# Altium PCB a4403-ELE_PCB.PcbDoc (part 4 of 5)
Units mm, origin at the board's own origin, x right, y up, seen from the top; angles counter-clockwise.
Board outline 160 x 110 mm, 4 copper layers (Top Layer, Int1 (GND), Int2 (PWR), Bottom Layer), stack 1.369 mm thick; 389 components, 298 nets, 1653 pads, 661 vias.
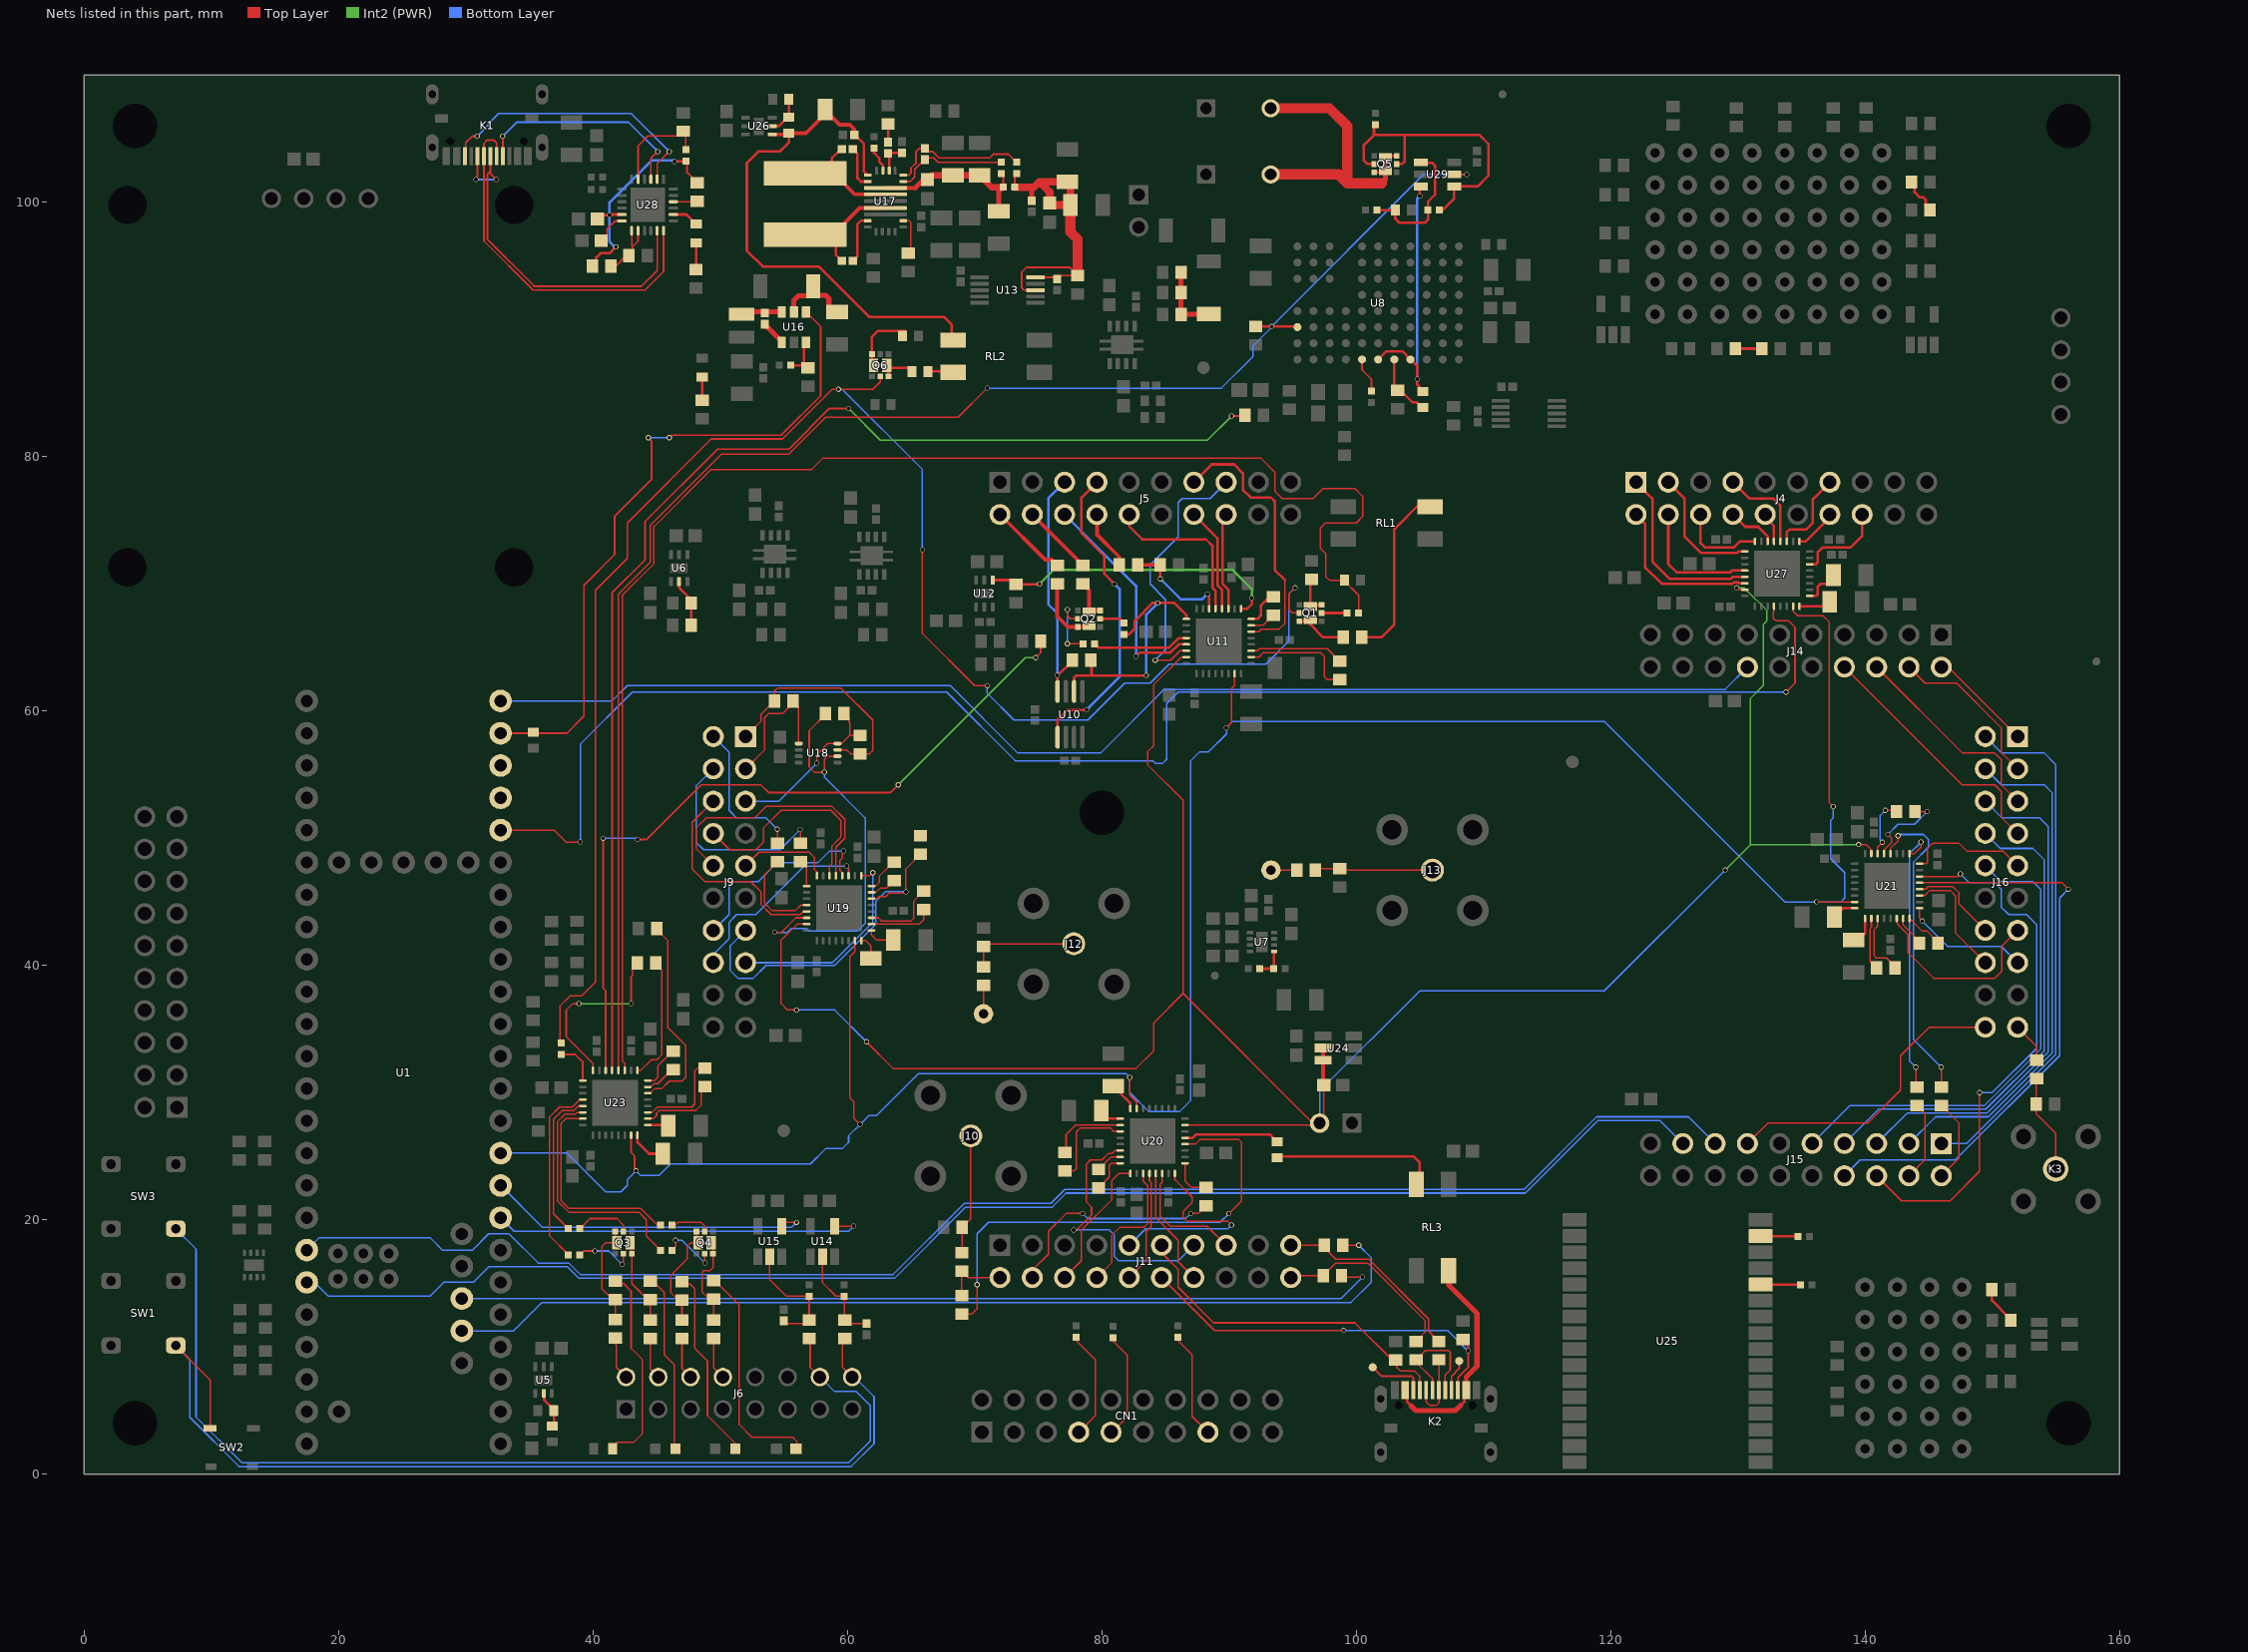
[diagram p5: the nets of this part, all layers, seen from the top]

## Via types
v1: diameter 0.4, hole 0.3, Top Layer to Bottom Layer, tented both sides, 576 vias
v2: diameter 0.5, hole 0.2, Top Layer to Bottom Layer, tented both sides, 59 vias
v3: diameter 0.4, hole 0.2, Top Layer to Bottom Layer, tented both sides, 24 vias
v4: diameter 0.5, hole 0.2, Top Layer to Bottom Layer, 2 vias

## Nets (pads, with @x,y where several pads share a name; then routed paths per layer and width w, separated by ;. In a path a pad name is that pad's centre, name@x,y a point inside that pad or via, vN(x,y) a via of type N, cw(c..) or ccw(c..) an arc to the next point about the centre after c; other vN are vias at no path point) (continued)
NetC48_2: C48.2 C59.1 C60.1 C102.1 C103.1 R50.1 R69.1 R71.1 U13.8 U13.10 | length 28.6
  Top Layer w0.14: R69.1@73.15,101.2 73.15,102.1 R71.1@73.3,102.25 ; U13.8@74.8,93.1 73.9,93.1 73.7,93.3 73.7,94.5 74.1,94.9 77.45,94.9 R50.1@78.1,94.25 76.77,94.25 C48.2@76.5,93.98 76.38,94.1 U13.10@74.8,94.1
  Top Layer w0.4: C102.1@74.5,100.14 74.5,101.025 74.675,101.2 ; C103.1@75.9,99.95 C103.1@76.05,99.8 ; C60.1@77.3,101.625 C60.1@77.525,101.4
  Top Layer w0.6: R69.1@73.15,101.2 74.675,101.2 75.1,101.625 ; C103.1@75.9,99.95 75.9,100.825 75.1,101.625 ; C103.1@76.05,99.8 C59.1@77.525,99.8 C60.1@77.525,101.4 ; C60.1@77.3,101.625 75.1,101.625
  Top Layer w0.8: C59.1@77.525,99.8 77.525,97.675 78.1,97.1 R50.1@78.1,94.25
NetC50_2: C50.2 D1.1 U16.5 | length 6.1
  Top Layer w0.4: U16.5@55.8,91.4 55.8,92.3 56.16,92.66 56.95,92.66 57.3,93.01 D1.1@57.3,93.05 ; D1.1@57.3,93.4 D1.1@57.3,93.05 ; C50.2@59.2,91.375 58.925,91.375 58.55,91.75 58.55,92.45 58.3,92.7 57.65,92.7 D1.1@57.3,93.05
NetC52_1: C52.1 R51.1 R52.1 U14.2 | length 8.3
  Top Layer w0.12: U14.2@58.05,17.1 58.05,15.05 59.1,14 R51.1@59.75,14 59.75,11.725 59.865,11.84 C52.1@61.5,11.84
NetC54_1: C54.1 R63.1 R64.1 U15.2 | length 9.8
  Top Layer w0.12: U15.2@53.9,17.1 53.9,15.3 55.2,14 R63.1@57,14 57,13.725 R64.1@57,12.125 57,11.725 56.885,11.84 C54.1@55,11.84
NetC55_1: C55.1 L3.2 U16.6 | length 3.2
  Top Layer w0.4: L3.2@51.7,91.2 51.9,91.4 U16.6@54.85,91.4
NetC55_2: C55.2 U16.1 | length 2
  Top Layer w0.4: C55.2@53.5,90.42 54.85,89.07 U16.1@54.85,89
NetC57_1: C57.1 U17.20 | length 4
  Top Layer w0.2: C57.1@60.44,95.4 60.8,95.76 60.8,98.3 61.06,98.56 U17.20@61.6,98.56
NetC57_2: C57.2 L1.2 U17.8 | length 9.8
  Top Layer w0.2: L1.2@56.7,97.474 58.126,97.474 59.1,96.5 59.1,95.86 C57.2@59.56,95.4
  Top Layer w0.3: L1.2@58.126,97.474 58.874,97.474 60.96,99.56 U17.8@63,99.56
NetC58_1: C58.1 U17.19 | length 3.4
  Top Layer w0.2: C58.1@60.44,104.2 60.8,103.84 60.8,101.9 61.06,101.64 U17.19@61.6,101.64
NetC58_2: C58.2 L1.1 U17.10 | length 9.7
  Top Layer w0.2: L1.1@56.7,102.3 57.8,102.3 58.8,103.3 58.8,103.5 59.5,104.2 C58.2@59.56,104.2
  Top Layer w0.3: L1.1@57.8,102.3 58.9,102.3 60.56,100.64 U17.10@63,100.64
NetC62_1: C62.1 C63.1 C64.1 C104.1 R69.2 R70.1 U17.11 | length 13.2
  Top Layer w0.14: R70.1@72.1,102.25 72.25,102.1 R69.2@72.25,101.2
  Top Layer w0.3: U17.11@63,101.14 65.34,101.14 ; C62.1@66,101.8 C62.1@66.3,101.8
  Top Layer w0.4: 65.34,101.14 C62.1@66,101.8 ; C62.1@66.3,101.8 C62.1@66.625,102.125 ; C63.1@70.375,102.15 C63.1@70.4,102.125 ; C64.1@71.9,99.3 71.9,100.85 R69.2@72.25,101.2
  Top Layer w0.5: C62.1@66.625,102.125 C63.1@70.4,102.125 71.325,101.2 R69.2@72.25,101.2
NetC69_2: C69.2 U19.9 | length 2.2
  Top Layer w0.12: U19.9@61.9,42.75 61.9,42.4 62.3,42 C69.2@63.6,42
NetC71_2: C71.2 U19.8 | length 1.9
  Top Layer w0.12: U19.8@61.1,41.95 61.45,41.95 61.85,41.55 C71.2@61.85,40.55
NetC78_2: C78.2 U20.8 | length 2.2
  Top Layer w0.2: C78.2@80.9,30.2 81.2,30.2 82.25,29.15 U20.8@82.25,28.75
NetC79_2: C79.2 U20.9 | length 1.6
  Top Layer w0.2: C79.2@80,28.25 80.3,27.95 U20.9@81.45,27.95
NetC91_2: C91.2 U21.8 | length 1.9
  Top Layer w0.2: C91.2@137.6,43.8 138.3,44.5 U21.8@139.2,44.5
NetC93_2: C93.2 U21.9 | length 1.9
  Top Layer w0.2: C93.2@139.5,42 140,42.5 U21.9@140,43.7
NetC100_2: C100.2 U28.24 | length 2.5
  Top Layer w0.14: C100.2@40.65,97 40.675,97 41.105,97.43 41.105,97.905 41.75,98.55 U28.24@42.275,98.55
NetC108_2: C108.2 C109.2 R78.2 RL2.1 U17.18 U26.1 | length 43.5
  Top Layer w0.2: R78.2@55.4,105.45 55.4,104.7 54.7,104 53,104 52.1,103.1 52.1,96.2 53.343,94.957 57.743,94.957 61.7,91 67.6,91 68.21,90.39 RL2.1@68.21,89.2 ; C108.2@60.54,105.3 60.6,105.3 61.3,104.6 61.3,102.44 U17.18@61.6,102.14
  Top Layer w0.3: U26.1@54.1,105.35 55.3,105.35 R78.2@55.4,105.45 56.75,105.45 58.25,106.95 C109.2@58.25,107.25 ; C109.2@58.25,107.3 C109.2@58.25,107.25 ; C108.2@60.54,105.3 60.54,105.76 60.2,106.1 59.4,106.1 C109.2@58.25,107.25
NetC110_1: C110.1 R71.2 U17.13 | length 11
  Top Layer w0.14: U17.13@64.4,102.14 64.84,102.14 65,102.3 65,102.7 65.4,103.1 65.4,104 65.64,104.24 C110.1@66.1,104.24 ; C110.1@66.2,104 66.7,104 67.2,103.5 71.2,103.5 71.5,103.8 72.65,103.8 R71.2@73.3,103.15
NetC110_2: C110.2 R70.2 U17.12 | length 9
  Top Layer w0.14: U17.12@64.4,101.64 64.94,101.64 65.3,102 65.3,102.6 66,103.3 66.1,103.3 66.13,103.33 66.3,103.5 66.8,103.5 67.15,103.15 R70.2@72.1,103.15
NetC111_1: C111.1 R77.1 | length 1.1
  Top Layer w0.2: C111.1@63.2,104.74 R77.1@63.2,105.8
NetC111_2: C111.2 C112.2 U17.15 | length 2.5
  Top Layer w0.2: U17.15@63.3,102.5 63.3,103.76 C111.2@63.2,103.86 63.24,103.9 C112.2@64.3,103.9
NetC116_2: C116.2 U23.8 | length 2.9
  Top Layer w0.2: U23.8@43.5,26.65 43.5,26.1 44.4,25.2 C116.2@45.5,25.2
NetC118_2: C118.2 U23.9 | length 1.6
  Top Layer w0.2: U23.9@44.3,27.45 45.875,27.45 C118.2@45.925,27.4
NetC128_2: C128.2 R124.2 R127.1 R131.2 U28.23 | length 18.2
  Top Layer w0.14: C128.2@40.65,98.7 40.65,98.95 40.7,99 C128.2@40.75,99.05 ; R127.1@47.3,103.25 47.4,103.15 47.4,102.35 R131.2@48.2,101.55
  Top Layer w0.2: R124.2@40.25,95 40.25,95.65 40.6,96 41.3,96 v1(41.8,96.5) ; C128.2@40.35,98.7 40.65,99 40.7,99 v1(41.3,99) 41.35,99.05 U28.23@42.275,99.05 ; v1(46.4,103.2) 46.425,103.225 47.275,103.225 R127.1@47.3,103.25
  Bottom Layer w0.2: v1@41.7,96.5 41.3,96.9 v1(41.3,99) 41.3,100 44.6,103.3 46.3,103.3 v1(46.4,103.2)
NetC129_2: C129.2 U27.8 | length 2.5
  Top Layer w0.2: U27.8@134.85,68.25 136.875,68.25 C129.2@137.225,68.6
NetC131_2: C131.2 U27.9 | length 2.9
  Top Layer w0.2: U27.9@135.65,69.05 136.15,69.05 136.3,69.2 136.3,69.8 136.5,70 137.05,70 137.225,70.175 C131.2@137.225,70.7
NetCN1_7: CN1.7 R101.2 | length 8.4
  Top Layer w0.12: R101.2@78,10.5 79.5,9 79.5,4.6 CN1.7@78.195,3.295
NetCN1_9: CN1.9 R102.2 | length 8.2
  Top Layer w0.12: CN1.9@80.765,3.265 82,4.5 82,9.35 R102.2@80.9,10.45
NetCN1_15: CN1.15 R104.2 | length 8.2
  Top Layer w0.12: R104.2@86,10.5 87.1,9.4 87.1,4.55 CN1.15@88.35,3.3
NetD2_1: D2.1 R57.2 | length 16.3
  Top Layer w0.12: D2.1@41.5,1.75 41.5,2.1 41.9,2.5 43.2,2.5 43.9,3.2 43.9,9 43,9.9 43,14.4 42.425,14.975 R57.2@41.75,14.975
NetD3_1: D3.1 R58.2 | length 14.3
  Top Layer w0.12: R58.2@44.5,14.975 44.925,14.975 45.6,14.3 45.6,9.4 46.4,8.6 46.4,1.95 D3.1@46.6,1.75
NetD4_2: D4.2 R59.2 | length 15.4
  Top Layer w0.12: R59.2@47,14.95 47.65,14.95 48,14.6 48,9.9 49,8.9 49,4.6 51.35,2.25 D4.2@51.35,1.75
NetD5_2: D5.2 R60.2 | length 18
  Top Layer w0.12: R60.2@49.5,15 49.8,15 51.5,13.3 51.5,3.9 52.5,2.9 55.7,2.9 56.024,2.576 D5.2@56.024,1.75
NetD6_1: D6.1 U28.8 | length 2.1
  Top Layer w0.2: U28.8@46.325,99.05 47.35,99.05 D6.1@48.1,98.3
NetD6_2: D6.2 R125.1 | length 2.1
  Top Layer w0.2: R125.1@48.1,94.725 D6.2@48.1,96.8
NetD7_1: D7.1 R123.2 | length 1.9
  Top Layer w0.2: R123.2@48.55,84.375 R123.2@48.6,84.425 D7.1@48.6,86.25
NetD9_1: D9.1 R86.2 R133.2 R134.2 | length 5.5
  Top Layer w0.4: R134.2@86.225,94.5 R133.2@86.225,92.9 R86.2@86.225,91.2 86.237,91.212 88.388,91.212 D9.1@88.4,91.225
NetJ4_1: J4.1 U27.29 | length 14.7
  Top Layer w0.2: J4.1@122,78 123.3,76.7 123.3,71.751 124.656,70.395 129.435,70.395 129.591,70.55 U27.29@130.55,70.55
NetJ4_2: J4.2 U27.30 | length 12.9
  Top Layer w0.2: J4.2@122,75.46 122,75.434 122.7,74.734 122.7,71.337 124.027,70.01 129.576,70.01 129.695,70.129 130.022,70.129 130.102,70.05 U27.30@130.55,70.05
NetJ4_3: J4.3 U27.25 | length 10.1
  Top Layer w0.2: J4.3@124.54,78 125.8,76.74 125.8,73.768 127.141,72.427 129.927,72.427 130.05,72.55 U27.25@130.55,72.55
NetJ4_4: J4.4 U27.28 | length 10.2
  Top Layer w0.2: J4.4@124.54,75.46 124.54,71.56 125.19,70.91 129.403,70.91 129.543,71.05 U27.28@130.55,71.05
NetJ4_6: J4.6 U27.24 | length 6.9
  Top Layer w0.2: J4.6@127.08,75.46 127.08,73.22 127.435,72.865 129.689,72.865 130.174,73.35 U27.24@131.35,73.35
NetJ4_7: J4.7 U27.20 | length 7.3
  Top Layer w0.2: J4.7@129.62,78 130.92,76.7 132.8,76.7 133.35,76.15 U27.20@133.35,73.35
NetJ4_8: J4.8 U27.22 | length 3.8
  Top Layer w0.2: J4.8@129.62,75.46 130.58,74.5 131.6,74.5 132.35,73.75 U27.22@132.35,73.35
NetJ4_10: J4.10 U27.21 | length 2.4
  Top Layer w0.2: J4.10@132.16,75.46 132.16,75.248 132.85,74.558 U27.21@132.85,73.35
NetJ4_13: J4.13 U27.19 | length 6.8
  Top Layer w0.2: U27.19@133.85,73.35 133.85,74.05 134.1,74.3 135.4,74.3 135.9,74.8 135.9,76.66 J4.13@137.24,78
NetJ4_14: J4.14 U27.17 | length 3.4
  Top Layer w0.2: U27.17@134.85,73.35 135.35,73.35 137.24,75.24 J4.14@137.24,75.46
NetJ4_16: J4.16 U27.14 | length 7.2
  Top Layer w0.2: U27.14@135.65,71.55 136.15,71.55 136.3,71.7 136.3,72.5 136.666,72.866 138.866,72.866 139.78,73.78 J4.16@139.78,75.46
NetJ5_2: J5.2 R39.2 | length 6.2
  Top Layer w0.3: J5.2@72,75.46 75.56,71.9 76.075,71.9 R39.2@76.5,71.475
NetJ5_4: J5.4 R38.2 | length 5.7
  Top Layer w0.3: J5.4@74.54,75.46 78.5,71.5 R38.2@78.5,71.45
NetJ5_5: J5.5 R141.1 U10.8 | length 19
  Top Layer w0.2: U10.8@76.525,61.55 76.5,61.575 v1(76.5,62.8) 76.55,62.8 77.675,63.925 R141.1@77.675,64
  Bottom Layer w0.2: v1(76.5,62.8) 76.5,67.7 75.8,68.4 75.8,76.72 J5.5@77.08,78
NetJ5_6: J5.6 U11.29 | length 17.8
  Top Layer w0.2: v1(82.7,64.3) 83,64.6 85.4,64.6 86.05,65.25 U11.29@86.65,65.25
  Bottom Layer w0.2: J5.6@77.08,75.46 82.7,69.84 v1(82.7,64.3)
NetJ5_7: J5.7 U10.1 | length 24.7
  Top Layer w0.2: U10.1@76.525,57.95 76.525,59.325 77.3,60.1 v1(78.8,60.1) ; J5.7@79.62,78 78.4,76.78 78.4,74 80.2,72.2 80.2,70.8 v1(81,70)
  Bottom Layer w0.2: v1(78.8,60.1) 81.4,62.7 81.4,69.6 v1(81,70)
NetJ5_8: J5.8 R40.2 | length 4.7
  Top Layer w0.3: J5.8@79.62,75.46 79.62,73.88 81.375,72.125 R40.2@81.375,71.5
NetJ5_10: J5.10 U11.21 | length 13.2
  Top Layer w0.2: J5.10@82.16,75.46 82.16,74.54 83.2,73.5 88.2,73.5 88.7,73 88.7,69.7 88.95,69.45 U11.21@88.95,68.05
NetJ5_13: J5.13 U11.14 | length 21.8
  Top Layer w0.12: U11.14@91.75,66.25 92.35,66.25 92.55,66.45 93.95,66.45 94.4,66.9 94.4,70.3
  Top Layer w0.2: J5.13@87.24,78 88.64,79.4 90.4,79.4 91.1,78.7 91.1,77.4 91.7,76.8 93.3,76.8 93.6,76.5 93.6,71.1 94.4,70.3
NetJ5_14: J5.14 U11.20 | length 8.3
  Top Layer w0.2: J5.14@87.24,75.46 89.1,73.6 89.1,69.9 89.45,69.55 U11.20@89.45,68.05
NetJ5_15: J5.15 U11.30 | length 21.3
  Top Layer w0.14: v1(84.2,64) 85.4,64 86.15,64.75 U11.30@86.65,64.75
  Bottom Layer w0.14: v1(84.2,64) 85,64.8 85,68.8 83.8,70 83.8,71.5 86,73.7 86,76.4 86.32,76.72 88.5,76.72 J5.15@89.78,78
NetJ5_16: J5.16 U11.19 | length 7.7
  Top Layer w0.2: J5.16@89.78,75.46 89.5,75.18 89.5,70 89.95,69.55 U11.19@89.95,68.05
NetJ6_2: J6.2 R53.2 | length 3
  Top Layer w0.12: R53.2@41.75,10.275 41.84,10.185 41.84,8.4 J6.2@42.6,7.64
NetJ6_4: J6.4 R54.2 | length 2.9
  Top Layer w0.12: R54.2@44.5,10.3 44.5,8.28 J6.4@45.14,7.64
NetJ6_6: J6.6 R55.2 | length 2.9
  Top Layer w0.12: R55.2@47,10.275 47,8.32 J6.6@47.68,7.64
NetJ6_8: J6.8 R56.2 | length 2.9
  Top Layer w0.12: R56.2@49.5,10.275 49.5,8.36 J6.8@50.22,7.64
NetJ6_14: J6.14 R64.2 SW3.1 | length 81.9
  Top Layer w0.12: R64.2@57,10.275 57.08,10.195 57.08,8.4 J6.14@57.84,7.64
  Bottom Layer w0.12: SW3.1@7.2,19.3 8.8,17.7 8.8,4.5 12.4,0.9 60.1,0.9 61.8,2.6 61.8,5.4 60.7,6.5 59,6.5 J6.14@57.415,8.085
NetJ6_16: J6.16 R52.2 SW1.1 SW2.D | length 78.9
  Top Layer w0.12: SW1.1@7.2,10.12 9.9,7.42 SW2.D@9.9,3.6 ; R52.2@59.75,10.275 59.62,10.145 59.62,8.4 J6.16@60.38,7.64
  Bottom Layer w0.12: SW1.1@7.2,10.12 8.3,9.02 8.3,4.47 12.17,0.6 60.3,0.6 62.1,2.4 62.1,6.1 J6.16@60.45,7.75
NetJ9_1: J9.1 R90.1 R91.1 U18.7 | length 18.8
  Top Layer w0.12: J9.1@52,58 53.2,59.2 53.2,59.725 R91.1@54.275,60.8 54.275,61.575 54.5,61.8 59.5,61.8 62,59.3 62,56.9 61.75,56.65 R90.1@61,56.65 60.25,56.65 59.95,56.95 U18.7@59.225,56.95
NetJ9_2: J9.2 R95.1 | length 11.8
  Top Layer w0.12: v1(54.496,50.709) 54.496,49.639 R95.1@54.508,49.628
  Bottom Layer w0.12: J9.2@49.46,58 50.7,56.76 50.7,52.2 51.3,51.6 53.6,51.6 54.491,50.709 v1(54.496,50.709)
NetJ9_3: J9.3 R91.2 U18.1 | length 11.1
  Top Layer w0.12: J9.3@52,55.46 53.5,56.96 53.5,59.5 53.8,59.8 54.9,59.8 55.725,60.625 R91.2@55.725,60.8 56.175,60.35 U18.1@56.175,57.45
NetJ9_4: J9.4 R93.1 | length 16.7
  Top Layer w0.12: v1(56.3,50.7) R93.1@56.3,49.625 R93.1@56.4,49.725
  Bottom Layer w0.12: J9.4@49.46,55.46 48.1,54.1 48.1,49.7 48.7,49.1 54.7,49.1 v1(56.3,50.7)
NetJ9_5: J9.5 R90.2 R144.1 U18.8 | length 13.5
  Top Layer w0.12: v1(57.6,55.9) 57.6,56.6 58.45,57.45 U18.8@59.225,57.45 59.55,57.45 60.2,58.1 ; R144.1@59.725,59.8 60.115,59.41 60.115,59.185 60.2,59.1 60.2,58.1 ; R90.2@61,58.1 60.2,58.1
  Bottom Layer w0.12: J9.5@52,52.92 54.62,52.92 v1(57.6,55.9)
NetJ9_6: J9.6 U19.29 | length 17.2
  Top Layer w0.12: J9.6@49.46,52.92 47.8,51.26 47.8,47.6 48.8,46.6 52.4,46.6 53.2,45.8 53.2,44.8 54,44 56.3,44 56.55,44.25 U19.29@56.8,44.25
NetJ9_8: J9.8 U19.22 | length 17.6
  Top Layer w0.12: J9.8@49.46,50.38 50.74,49.1 52.8,49.1 53.4,49.7 53.4,50.8 54.8,52.2 58.7,52.2 59.5,51.4 59.5,50.1 58.8,49.4 58.8,48 58.6,47.8 U19.22@58.6,47.05
NetJ9_9: J9.9 U19.24 | length 7.5
  Top Layer w0.12: J9.9@52,47.84 53.06,48.9 57,48.9 57.4,48.5 57.4,47.563 57.6,47.362 U19.24@57.6,47.05
NetJ9_10: J9.10 U19.21 | length 21.1
  Top Layer w0.12: J9.10@49.46,47.84 48.1,49.2 48.1,50.8 48.9,51.6 52.7,51.6 53.6,52.5 58.8,52.5 59.8,51.5 59.8,50 59.1,49.3 U19.21@59.1,47.05
NetJ9_13: J9.13 R92.1 U19.14 | length 27.8
  Top Layer w0.12: U19.14@61.9,45.25 62.35,45.25 62.519,45.419 63.019,45.419 63.3,45.7 v1@64.5,45.7 ; v1(64.6,45.8) 64.6,47.6 R92.1@65.75,48.75
  Bottom Layer w0.12: J9.13@52,42.76 50.8,41.56 50.8,39.6 51.4,39 52.6,39 53.6,40 59,40 62.238,43.238 62.238,45.038 63,45.8 v1(64.6,45.8)
NetJ9_14: J9.14 U19.20 | length 16.3
  Top Layer w0.12: U19.20@59.6,47.05 59.6,47.3 59.4,47.5 59.4,48.238 59.6,48.438 59.6,48.9 v1(59.7,49)
  Bottom Layer w0.12: J9.14@49.46,42.76 50.7,44 50.7,46.3 51,46.6 53,46.6 54.5,48.1 57.7,48.1 58.6,49 v1(59.7,49)
NetJ9_15: J9.15 U19.17 | length 16.2
  Top Layer w0.12: U19.17@61.1,47.05 61.75,47.05 v1(62,47.3)
  Bottom Layer w0.12: J9.15@52,40.22 58.82,40.22 62,43.4 v1(62,47.3)
NetJ9_16: J9.16 U19.19 | length 15.6
  Top Layer w0.12: v1(59.943,47.822) 60.1,47.665 U19.19@60.1,47.05
  Bottom Layer w0.12: J9.16@49.46,40.22 49.46,40.86 50.7,42.1 50.7,43.4 51.3,44 52.8,44 56.622,47.822 v1(59.943,47.822)
NetJ10_1: J10.1 R97.2 R99.1 | length 9.5
  Top Layer w0.12: R97.2@69,17.4 69.025,17.425 R99.1@69.025,19.4 69.7,20.075 J10.1@69.7,26.6
NetJ11_2: J11.2 R97.1 R110.1 | length 5.1
  Top Layer w0.12: R110.1@69,14.025 R97.1@69,15.95 69.49,15.46 J11.2@72,15.46
NetJ11_4: J11.4 R108.1 | length 17.7
  Top Layer w0.12: J11.4@74.54,15.46 74.54,16.04 75.8,17.3 75.8,19.1 77.2,20.5 v1(78.5,20.5) ; v1(87,20.5) 87.6,20.5 R108.1@88.2,21.1
  Bottom Layer w0.12: v1(78.5,20.5) 78.9,20.1 86.6,20.1 v1(87,20.5)
NetJ11_6: J11.6 U20.17 | length 10.9
  Top Layer w0.12: J11.6@77.08,15.46 78.4,16.78 78.4,19.2 80.8,21.6 80.8,23.1 81.35,23.65 U20.17@82.25,23.65
NetJ11_8: J11.8 U20.19 | length 11.1
  Top Layer w0.12: J11.8@79.62,15.46 80.8,16.64 80.8,18.8 81.4,19.4 83.3,19.4 83.6,19.7 83.6,22.7 83.25,23.05 U20.19@83.25,23.65
NetJ11_9: J11.9 U20.24 | length 17.1
  Top Layer w0.12: U20.24@85.75,23.65 85.75,23.15 87.1,21.8 87.1,21.351 86.4,20.651 86.4,20.2 86.7,19.9 89.9,19.9 v1(90.2,19.6)
  Bottom Layer w0.12: J11.9@82.16,18 83.46,19.3 89.9,19.3 v1(90.2,19.6)
NetJ11_10: J11.10 U20.20 | length 9
  Top Layer w0.12: J11.10@82.16,15.46 83.5,16.8 83.5,19.1 83.9,19.5 83.9,22.9 83.75,23.05 U20.20@83.75,23.65
NetJ11_11: J11.11 K2.A5 R105.2 | length 27.3
  Top Layer w0.12: R105.2@103.2,8.95 103.2,8.4 103.5,8.1 104.6,8.1 105,7.7 K2.A5@105,6.6
  Top Layer w0.14: J11.11@84.7,18 84.7,17.4 86,16.1 86,14.7 88.8,11.9 99.9,11.9 103.025,8.775 R105.2@103.2,8.95
NetJ11_12: J11.12 K2.B5 R103.2 | length 30.7
  Top Layer w0.12: K2.B5@108,6.6 108,7.6 108.4,8 108.8,8.4
  Top Layer w0.14: J11.12@84.7,15.46 88.86,11.3 v1(99,11.3) ; R103.2@108.5,10.35 108.8,10.05 v1(108.8,9.7) 108.8,8.4
  Bottom Layer w0.14: v1(99,11.3) 107.2,11.3 v1(108.8,9.7)
NetJ11_13: J11.13 U20.14 | length 21.1
  Top Layer w0.12: v1(77.8,19.2) 78,19.2 79.2,20.4 79.2,21 78.8,21.4 78.8,24.4 79.1,24.7 80,24.7 80.5,25.2 80.8,25.2 81.05,25.45 U20.14@81.45,25.45
  Bottom Layer w0.12: v1(77.8,19.2) 80.6,19.2 81,18.8 81,17.1 81.3,16.8 86.04,16.8 J11.13@87.24,18
NetJ11_14: J11.14 U20.21 | length 9.4
  Top Layer w0.12: U20.21@84.25,23.65 84.25,20.15 86,18.4 86,16.7 J11.14@87.24,15.46
NetJ11_15: J11.15 U20.22 | length 9.5
  Top Layer w0.12: U20.22@84.75,23.65 84.75,22.95 84.6,22.8 84.6,20.3 85.4,19.5 88.28,19.5 J11.15@89.78,18
NetJ11_19: J11.19 R100.2 R107.2 | length 15.4
  Top Layer w0.12: J11.19@94.86,18 R100.2@97.5,18 97.5,17.8 98.4,16.9 101,16.9 105.7,12.2 105.7,11.25 R107.2@106.5,10.45
NetJ11_20: J11.20 R98.2 R106.2 | length 14.8
  Top Layer w0.12: J11.20@94.86,15.46 95,15.6 R98.2@97.4,15.6 98.4,16.6 100.9,16.6 105.4,12.1 105.4,11.15 R106.2@104.7,10.45
NetJ12_1: J12.1 R112.2 R114.1 | length 8.8
  Top Layer w0.12: R112.2@70.7,39.9 R114.1@70.7,41.5 70.9,41.7 J12.1@77.8,41.7
NetJ13_1: J13.1 R113.2 R115.1 | length 9.2
  Top Layer w0.12: R113.2@96.8,47.5 96.925,47.625 R115.1@98.7,47.625 ; R115.1@98.725,47.5 J13.1@106,47.5
NetJ14_2: J14.2 J16.1 | length 8.3
  Top Layer w0.12: J14.2@146,63.46 146.54,63.46 J16.1@152,58
NetJ14_4: J14.4 J16.3 | length 13
  Top Layer w0.12: J14.4@143.46,63.46 144.72,62.2 147.2,62.2 150.7,58.7 150.7,56.76 J16.3@152,55.46
NetJ14_6: J14.6 J16.5 | length 16.6
  Top Layer w0.12: J14.6@140.92,63.46 147.68,56.7 150.2,56.7 150.7,56.2 150.7,54.22 J16.5@152,52.92
NetJ14_8: J14.8 J16.7 | length 20.2
  Top Layer w0.12: J14.8@138.38,63.46 147.64,54.2 150.2,54.2 150.7,53.7 150.7,51.68 J16.7@152,50.38
NetJ14_14: J14.14 U1.23 | length 103.5
  Bottom Layer w0.12: U1.23@32.74,60.8 41.5,60.8 42.7,62 68.1,62 73.4,56.7 79.9,56.7 84.91,61.71 129.01,61.71 J14.14@130.76,63.46
NetJ15_1: J15.1 J16.2 | length 41.2
  Bottom Layer w0.12: J15.1@146,26 148,26 155,33 155,55.8 154.1,56.7 150.76,56.7 J16.2@149.46,58
NetJ15_2: J15.2 R120.1 | length 6.7
  Top Layer w0.12: J15.2@146,23.46 147.4,24.86 147.4,27.6 R120.1@146,29
NetJ15_3: J15.3 J16.4 | length 40.7
  Bottom Layer w0.12: J15.3@143.46,26 145.56,28.1 149.7,28.1 154.7,33.1 154.7,53.6 154.1,54.2 150.72,54.2 J16.4@149.46,55.46
NetJ15_4: J15.4 R118.1 | length 6.3
  Top Layer w0.12: J15.4@143.46,23.46 144.7,24.7 144.7,28.4 R118.1@144.1,29
NetJ15_5: J15.5 J16.6 | length 40
  Bottom Layer w0.12: J15.5@140.92,26 143.32,28.4 149.6,28.4 154.4,33.2 154.4,50.932 153.732,51.6 150.78,51.6 J16.6@149.46,52.92
NetJ15_6: J15.6 U21.22 | length 43.5
  Top Layer w0.12: J15.6@140.92,23.46 142.88,21.5 146.7,21.5 149,23.8 v1(149,30) ; U21.22@144.3,47 147.3,47 v1(147.5,47.2)
  Bottom Layer w0.12: v1(147.5,47.2) 148.2,46.5 150.2,46.5 150.7,46 150.7,44.6 151.3,44 152.7,44 153.5,43.2 153.5,33.5 150,30 v1(149,30)
NetJ15_7: J15.7 J16.8 | length 39.2
  Bottom Layer w0.12: J15.7@138.38,26 141.08,28.7 149.5,28.7 154.1,33.3 154.1,48.3 153.2,49.2 150.64,49.2 J16.8@149.46,50.38
NetJ15_8: J15.8 U21.21 | length 46.1
  Top Layer w0.12: U21.21@144.3,46.5 155.5,46.5 v1(156,46)
  Bottom Layer w0.12: J15.8@138.38,23.46 139.62,24.7 147.1,24.7 155.3,32.9 155.3,45.3 v1(156,46)
NetJ15_9: J15.9 J16.10 | length 38.7
  Bottom Layer w0.12: J15.9@135.84,26 138.84,29 149.4,29 153.8,33.4 153.8,46 153.2,46.6 150.7,46.6 J16.10@149.46,47.84
NetJ15_13: J15.13 J16.20 | length 24.1
  Top Layer w0.12: J15.13@130.76,26 132.36,27.6 140.2,27.6 142.8,30.2 142.8,32.9 145.04,35.14 J16.20@149.46,35.14
NetJ15_15: J15.15 U1.41 | length 119.4
  Bottom Layer w0.12: U1.41@17.5,17.62 18.48,18.6 27.2,18.6 28.2,17.6 30.5,17.6 31.8,18.9 33.4,18.9 35.7,16.6 38.1,16.6 39,15.7 63.6,15.7 69.2,21.3 76,21.3 77.1,22.4 113.2,22.4 118.9,28.1 126.12,28.1 J15.15@128.22,26
NetJ15_17: J15.17 U1.42 | length 115.8
  Bottom Layer w0.12: U1.42@17.5,15.08 18.12,15.08 19.2,14 27.2,14 28.3,15.1 30.6,15.1 31.8,16.3 38,16.3 38.9,15.4 63.7,15.4 69.3,21 76.1,21 77.2,22.1 113.3,22.1 119,27.8 123.88,27.8 J15.17@125.68,26
NetJ16_9: J16.9 U21.24 | length 9.7
  Top Layer w0.12: U21.24@144.3,48 144.8,48 144.9,48.1 144.9,49.2 145.3,49.6 147.4,49.6 148,49 150.84,49 J16.9@152,47.84
NetJ16_13: J16.13 U21.14 | length 15.2
  Top Layer w0.12: U21.14@142.5,43.7 142.5,43.4 142.6,43.3 142.6,43.2 143.4,42.4 143.4,41 145.4,39 150.2,39 150.74,39.54 150.74,41.5 J16.13@152,42.76
NetJ16_14: J16.14 U21.20 | length 7.2
  Top Layer w0.12: U21.20@144.3,46 144.8,46 145,46.2 146.9,46.2 147.4,45.7 147.4,44.82 J16.14@149.46,42.76
NetJ16_15: J16.15 U21.17 | length 9.9
  Top Layer w0.12: U21.17@144.3,44.5 144.3,43.7 v1(144.5,43.5)
  Bottom Layer w0.12: v1(144.5,43.5) 146.5,41.5 150.72,41.5 J16.15@152,40.22
NetJ16_16: J16.16 U21.19 | length 9.4
  Top Layer w0.12: U21.19@144.3,45.5 144.7,45.5 145.1,45.9 146.7,45.9 147.1,45.5 147.1,42.58 J16.16@149.46,40.22
NetJ16_19: J16.19 R116.2 | length 3.2
  Top Layer w0.12: J16.19@152,35.14 153.5,33.64 R116.2@153.5,32.55
NetK1_A5: K1.A5 U28.15 | length 17.6
  Top Layer w0.14: v1(32.9,105.2) 32.915,105.185 32.915,103.645 K1.A5@32.93,103.63 ; U28.15@44.55,101.825 44.55,103.45 v1(45.1,104)
  Bottom Layer w0.14: v1(32.9,105.2) 34,106.3 42.8,106.3 v1(45.1,104)
NetK1_A6: K1.A6 K1.B6 U28.5 | length 29.5
  Top Layer w0.14: v1(30.8,101.8) 30.93,101.93 K1.B6@30.93,103.63 ; K1.A6@31.93,103.63 31.93,102.43 ; v1(32.4,101.8) 31.93,102.27 31.93,102.43 ; U28.5@45.05,97.775 45.05,94.65 43.8,93.4 35.4,93.4 31.7,97.1 31.7,102.2 31.93,102.43
  Bottom Layer w0.14: v1(30.8,101.8) v1(32.4,101.8)
NetK1_A7: K1.A7 K1.B7 U28.6 | length 29.5
  Top Layer w0.14: K1.B7@32.43,103.63 32.43,104.67 32.2,104.9 31.7,104.9 31.43,104.63 K1.A7@31.43,103.63 31.43,96.97 35.3,93.1 44.1,93.1 45.55,94.55 U28.6@45.55,97.775
NetK1_B5: K1.B5 U28.14 | length 21.9
  Top Layer w0.14: K1.B5@29.93,103.63 30.003,103.703 30.003,104.703 30.5,105.2 v1(30.9,105.2) ; U28.14@45.05,101.825 45.05,103.05 v1(46,104)
  Bottom Layer w0.14: v1(30.9,105.2) 31.775,106.075 31.775,106.175 32.6,107 43,107 v1(46,104)
NetK2_A4B9: K2.A4B9 K2.A9B4 RL3.4 | length 17.6
  Top Layer w0.2: K2.A4B9@103.85,6.6 104,6.45 104,5.7 104.3,5.4 ; 108.2,5.4 108.5,5.7 108.5,6.45 K2.A9B4@108.65,6.6
  Top Layer w0.3: K2.A9B4@108.65,6.6 108.65,7.65
  Top Layer w0.4: 104.3,5.4 104.7,5 107.8,5 108.2,5.4 ; RL3.4@107.3,15.9 107.3,14.85 109.5,12.65 109.5,8.5 108.65,7.65
NetK2_A6: K2.A6 K2.B6 R106.1 | length 9.2
  Top Layer w0.12: K2.A6@106,6.6 106,7.5 104.7,8.8 R106.1@104.7,9 105.432,9.732 107.268,9.732 107.4,9.6 107.4,8.2 107,7.8 K2.B6@107,6.6
NetK2_A7: K2.A7 K2.B7 R107.1 | length 5.5
  Top Layer w0.12: K2.B7@105.5,6.6 105.5,5.7 105.8,5.4 106.3,5.4 106.5,5.6 K2.A7@106.5,6.6 R107.1@106.5,9
NetK2_A8: K2.A8 TP4.1 | length 4.5
  Top Layer w0.14: TP4.1@101.3,8.4 102,7.7 104.4,7.7 104.5,7.6 K2.A8@104.5,6.6
NetK2_B8: K2.B8 TP5.1 | length 2.5
  Top Layer w0.14: K2.B8@107.5,6.6 107.5,7.7 108.1,8.3 TP5.1@108.1,8.9
NetK3_1: K3.1 R116.1 R117.1 | length 7.8
  Top Layer w0.12: R116.1@153.5,31.1 153.45,31.05 R117.1@153.45,29.1 153.45,28.35 155,26.8 K3.1@155,24
NetQ1_2: Q1.2 R37.2 | length 2
  Top Layer w0.2: Q1.2@97.275,67.715 R37.2@99.275,67.715
NetQ1_3: Q1.3 R30.1 | length 3
  Top Layer w0.2: R30.1@96.4,70.3 Q1.3@96.4,68.23 96.535,68.365 Q1.3@97.275,68.365
NetQ1_5: Q1.5 Q6.2 R138.1 | length 132.2
  Top Layer w0.12: R138.1@37.4,34.15 37.4,35.9 37.4,36.8 38.2,37.6 39.1,37.6 40.2,38.7 40.2,69.5 42.7,72 42.7,74.8 49.3,81.4 54.9,81.4 58.8,85.3 v1(59.3,85.3) 62,85.3 62.585,85.885 Q6.2@62.585,86.325 ; v1(65.9,72.7) 65.9,66.1 70,62 v1(71,62) ; v1(95.2,69.7) 94.7,69.2 94.7,68 94.985,67.715 Q1.5@95.525,67.715
  Bottom Layer w0.12: v1(59.3,85.3) 59.6,85.3 65.9,79 v1(65.9,72.7) ; v1(71,62) 71,61.4 73.1,59.3 78.9,59.3 81.8,62.2 83.8,62.2 85.3,63.7 92.9,63.7 94.7,65.5 94.7,69.2 v1(95.2,69.7)
NetQ1_6: Q1.6 R35.1 | length 4.3
  Top Layer w0.2: Q1.6@95.525,67.065 96.265,67.065 Q1.6@96.4,67.2 96.4,66.8 97.4,65.8 R35.1@98.975,65.8
NetQ2_2: Q2.2 R43.1 | length 5.1
  Top Layer w0.12: v1(77.3,65.3) R43.1@78.326,65.3 ; v1(77.3,68) 77.3,67.5 77.535,67.265 Q2.2@78.125,67.265
  Bottom Layer w0.12: v1(77.3,65.3) v1(77.3,68)
NetQ2_3: Q2.3 R39.1 | length 5.5
  Top Layer w0.3: R39.1@76.5,70.025 76.5,67.457 77.342,66.615 Q2.3@78.125,66.615 78.865,66.615 Q2.3@79,66.75
NetQ2_5: Q2.5 R41.1 | length 2
  Top Layer w0.2: Q2.5@79.875,67.265 81.41,67.265 R41.1@81.75,66.925
NetQ2_6: Q2.6 R38.1 | length 3.4
  Top Layer w0.3: R38.1@78.5,70 79,69.5 Q2.6@79,67.78 79.135,67.915 Q2.6@79.875,67.915
NetQ3_2: Q3.2 R61.1 | length 4.8
  Top Layer w0.12: R61.1@38.975,17.25 39.275,17.55 v1(40.15,17.55) ; v1(42.3,16.5) 42.4,16.6 Q3.2@42.4,17.325
  Bottom Layer w0.12: v1(40.15,17.55) 41.25,17.55 v1(42.3,16.5)
NetQ3_3: Q3.3 R54.1 R58.1 | length 7.1
  Top Layer w0.12: Q3.3@42.915,18.2 43.05,18.065 Q3.3@43.05,17.325 43.05,14.975 44.5,13.525 R54.1@44.5,12.125 R54.1@44.5,11.75
NetQ3_5: Q3.5 R62.1 | length 4.5
  Top Layer w0.12: R62.1@38.972,19.304 39.768,20.1 41.9,20.1 42.4,19.6 Q3.5@42.4,19.075
NetQ3_6: Q3.6 R53.1 R57.1 | length 8.9
  Top Layer w0.12: R53.1@41.75,11.725 41.75,13.525 40.7,14.575 40.7,17.9 41,18.2 Q3.6@41.885,18.2 41.75,18.335 Q3.6@41.75,19.075
NetQ4_2: Q4.2 R65.1 | length 4.7
  Top Layer w0.12: R65.1@46.225,17.6 46.5,17.875 v1(46.5,18.4) ; Q4.2@48.785,17.325 48.785,16.615 v1(48.8,16.6)
  Bottom Layer w0.12: v1(46.5,18.4) 47,18.4 v1(48.8,16.6)
NetQ4_3: Q4.3 R56.1 R60.1 | length 7.6
  Top Layer w0.12: Q4.3@49.3,18.2 49.435,18.065 Q4.3@49.435,17.325 49.435,16.235 49.2,16 48.7,16 48.6,15.9 48.6,14.3 49.35,13.55 49.5,13.55 R56.1@49.5,12.125 R56.1@49.5,11.725
NetQ4_5: Q4.5 R66.1 | length 3.2
  Top Layer w0.12: R66.1@46.225,19.6 46.5,19.6 46.7,19.8 48.5,19.8 48.785,19.515 Q4.5@48.785,19.075
NetQ4_6: Q4.6 R55.1 R59.1 | length 9.1
  Top Layer w0.12: R55.1@47,11.725 47,13.5 46.9,13.5 46.1,14.3 46.1,15.6 47.4,16.9 47.4,17.9 47.7,18.2 Q4.6@48.27,18.2 48.135,18.335 Q4.6@48.135,19.075
NetQ5_2: Q5.2 Q5.5 R68.1 R85.1 U29.4 | length 24.1
  Top Layer w0.2: Q5.2@101.425,103.015 100.885,103.015 100.6,103.3 100.6,104.5 101.4,105.3 ; R68.1@101.5,106.1 101.4,106 101.4,105.3 ; Q5.5@103.175,103.015 103.615,103.015 103.8,103.2 103.8,105.3 109.7,105.3 110.4,104.6 110.4,102.1 109.55,101.25 U29.4@107.7,101.25 107.7,100.3 106.8,99.4 R85.1@106.55,99.4 ; 103.7,105.3 101.4,105.3
NetQ5_3: Q5.3 Q5.6 R72.2 R74.2 | length 24.1
  Top Layer w0.2: Q5.3@101.425,102.365 102.165,102.365 Q5.3@102.3,102.5 ; Q5.6@102.3,103.53 102.435,103.665 Q5.6@103.175,103.665
  Top Layer w0.4: 102,101.5 102.3,101.8 Q5.3@102.3,102.5 Q5.6@102.3,103.53
  Top Layer w0.8: R72.2@93.28,102.2 98.6,102.2 99.3,101.5 ; R74.2@93.28,107.4 97.9,107.4 99.3,106 99.3,101.5 ; 102,101.5 99.3,101.5
NetQ6_3: Q6.3 R83.2 | length 2.8
  Top Layer w0.2: Q6.3@63.1,87.2 Q6.3@63.235,87.065 ; Q6.3@63.235,86.325 Q6.3@63.235,87.065 ; R83.2@64.975,86.7 64.675,87 63.3,87 Q6.3@63.235,87.065
NetQ6_6: Q6.6 R84.2 | length 5.1
  Top Layer w0.2: Q6.6@62.07,87.2 61.935,87.335 Q6.6@61.935,88.075 61.935,89.435 62.4,89.9 R84.2@64.575,89.9
NetR14_2: R14.2 R67.1 U16.3 | length 2.9
  Top Layer w0.2: R67.1@55.55,87.2 56.6,87.2 56.6,88.85 U16.3@56.75,89
NetR21_1: R21.1 R26.2 U7.5 | length 2.5
  Top Layer w0.2: R21.1@92.4,39.75 R26.2@93.5,39.75 93.55,39.8 U7.5@93.55,41.1
NetR22_1: R22.1 R24.2 U5.2 | length 3
  Top Layer w0.2: U5.2@36.125,6.35 36.175,6.3 36.175,5.825 36.925,5.075 R22.1@36.925,5 36.925,4.025 R24.2@36.775,3.875 ; R24.2@36.75,3.625 R24.2@36.75,3.775
NetR23_1: R23.1 R25.2 U6.2 | length 3.8
  Top Layer w0.2: U6.2@46.775,70.2 46.775,69.725 47.725,68.775 R23.1@47.725,68.5 R25.2@47.725,66.75
NetR28_2: R28.2 U8.L6 U23.20 U29.5 | length 125.6
  Top Layer w0.12: U23.20@42,31.75 42,69.2 44.5,71.7 44.5,74.6 50.1,80.2 55.4,80.2 58.3,83.1 68.7,83.1 v1(71,85.4) ; R28.2@92.1,90.25 v1(93.35,90.25) ; U29.5@107.7,102.2 v1(108.7,102.2)
  Top Layer w0.2: R28.2@92.1,90.25 95.32,90.25 U8.L6@95.38,90.19
  Bottom Layer w0.12: v1(71,85.4) 89.4,85.4 91.9,87.9 91.9,88.725 v1@93.4,90.225 ; v1(93.35,90.25) 105.3,102.2 v1(108.7,102.2)
NetR29_1: R29.1 R32.2 U8.E8 | length 5.1
  Top Layer w0.2: U8.E8@103,87.65 103,85.475 R32.2@103.25,85.225 103.475,85.225 104.4,84.3 104.725,84.3 R29.1@105.25,83.775
NetR29_2: R29.2 U8.D8 U8.F8 U29.3 | length 21.2
  Top Layer w0.2: U8.F8@101.73,87.65 102.38,88.3 103.62,88.3 U8.D8@104.27,87.65 104.8,87.12 v1(104.8,86.1) 104.8,85.675 R29.2@105.25,85.225 ; v1(105,100.5) 105,101.15 U29.3@105.1,101.25
  Bottom Layer w0.2: v1(104.8,86.1) 104.8,100.3 v1(105,100.5)
NetR33_2: R33.2 U8.G8 | length 2.8
  Top Layer w0.14: U8.G8@100.46,87.65 100.46,86.84 101.2,86.1 R33.2@101.2,85.15
NetR35_2: R35.2 RL1.2 | length 13.4
  Top Layer w0.2: R35.2@100.425,65.8 102,65.8 103,66.8 103,74.3 RL1.2@105.065,76.365
NetR36_2: R36.2 U23.21 | length 96.9
  Top Layer w0.14: U23.21@41.5,31.75 41.5,69.3 44.1,71.9 44.1,74.9 49.8,80.6 55.4,80.6 58.6,83.8 v1(60.1,83.8) ; v1(90.2,83.2) 91.225,83.2 R36.2@91.275,83.25
  Int2 (PWR) w0.14: v1(60.1,83.8) 62.6,81.3 88.3,81.3 v1(90.2,83.2)
NetR37_1: R37.1 R137.2 U23.19 | length 118.5
  Top Layer w0.12: U23.19@42.5,31.75 42.5,32.3 42.3,32.5 42.3,69.1 44.8,71.6 44.8,74.5 49.3,79 57.2,79 58.1,79.9 92.5,79.9 93.6,78.8 93.6,77.3 94.2,76.7 96.6,76.7 97.4,77.5 99.9,77.5 100.5,76.9 100.5,75.3 ; R37.1@100.2,67.7 100.2,69.1 99,70.3 97.9,70.3 97.6,70.6 97.6,72.4 97.2,72.8 97.2,74.4 97.6,74.8 100,74.8 100.5,75.3 ; 100.5,75.4 100.5,75.3
NetR40_1: R40.1 R45.2 U11.22 | length 8.6
  Top Layer w0.2: v1(84.6,70.4) R45.2@84.6,71.5 ; v1(88.3,69.2) 88.45,69.05 U11.22@88.45,68.05
  Top Layer w0.3: R40.1@82.825,71.5 R45.2@84.6,71.5
  Bottom Layer w0.2: v1(84.6,70.4) 86.2,68.8 87.9,68.8 v1(88.3,69.2)
NetR41_2: R41.2 R141.2 U10.6 U11.25 | length 21.1
  Top Layer w0.2: U10.6@77.825,61.55 77.825,62.625 78,62.8 79.2,62.8 ; R141.2@79.125,64 79.2,63.925 79.2,62.8 ; R41.2@81.75,66.025 82.125,66.025 82.6,66.5 82.6,67.1 84,68.5 v1(84.4,68.5) 85.7,68.5 86.65,67.55 U11.25@86.65,67.25 ; v1(83.5,62.8) 79.2,62.8
  Bottom Layer w0.2: v1(83.5,62.8) 83.5,67.6 v1(84.4,68.5)
NetR42_1: R42.1 U11.11 | length 7.4
  Top Layer w0.12: U11.11@91.75,64.75 92.25,64.75 92.4,64.9 97.725,64.9 R42.1@98.7,63.925
NetR42_2: R42.2 U11.10 | length 8.9
  Top Layer w0.12: U11.10@91.75,64.25 92.35,64.25 92.7,64.6 97.2,64.6 97.5,64.3 97.5,62.7 97.725,62.475 R42.2@98.7,62.475
NetR43_2: R43.2 U11.28 | length 7.6
  Top Layer w0.2: R43.2@79.45,65.3 79.75,65 85.3,65 86.05,65.75 U11.28@86.65,65.75
NetR44_1: R44.1 U11.16 | length 2.9
  Top Layer w0.2: U11.16@91.75,67.25 92.25,67.25 92.5,67.5 92.5,68.3 93.2,69 R44.1@93.5,69
NetR44_2: R44.2 U11.15 | length 2.1
  Top Layer w0.12: U11.15@91.75,66.75 92.7,66.75 R44.2@93.5,67.55
NetR47_2: R47.2 U23.22 | length 60.3
  Top Layer w0.14: v1(40.8,50) 40.8,38.2 41,38 U23.22@41,31.75 ; v1(43.5,49.9) 44.2,49.9 48.5,54.2 53.2,54.2 53.8,53.6 63.4,53.6 v1(64,54.2) ; v1(74.8,64.2) 75.2,64.6 R47.2@75.2,65.5
  Int2 (PWR) w0.14: v1(64,54.2) 74,64.2 v1(74.8,64.2)
  Bottom Layer w0.14: v1(40.8,50) 43.4,50 v1(43.5,49.9)
NetR48_2: R48.2 U11.17 U12.4 | length 23.8
  Top Layer w0.2: U12.4@71.425,70.3 72.925,70.3 R48.2@73.25,69.975 75.075,69.975 v1(75.1,70) ; U11.17@90.95,68.05 91.45,68.05 91.8,68.4 v1(91.8,68.9)
  Int2 (PWR) w0.2: v1(75.1,70) 76.2,71.1 90.3,71.1 91.8,69.6 v1(91.8,68.9)
NetR61_2: R61.2 U23.28 | length 14.6
  Top Layer w0.12: R61.2@38.075,17.25 36.6,18.725 36.6,28.1 37.362,28.863 38.362,28.863 38.95,29.45 U23.28@39.2,29.45
NetR62_2: R62.2 U23.29 | length 11.8
  Top Layer w0.12: R62.2@38.072,19.304 36.9,20.476 36.9,27.9 37.6,28.6 38.5,28.6 38.85,28.95 U23.29@39.2,28.95
NetR65_2: R65.2 U23.30 | length 19
  Top Layer w0.12: U23.30@39.2,28.45 38.75,28.45 38.6,28.3 37.8,28.3 37.2,27.7 37.2,21.5 38.1,20.6 43.6,20.6 44.2,20 44.2,18.725 R65.2@45.325,17.6
NetR66_2: R66.2 U23.31 | length 16.3
  Top Layer w0.12: U23.31@39.2,27.95 37.85,27.95 37.5,27.6 37.5,21.5 38.1,20.9 43.75,20.9 R66.2@45.05,19.6
NetR75_2: R75.2 U17.16 | length 2
  Top Layer w0.2: R75.2@62.1,104.25 62.1,103.9 62.5,103.5 62.5,103.2 62.8,102.9 U17.16@62.8,102.5
NetR76_2: R76.2 U17.6 | length 2.7
  Top Layer w0.12: U17.6@64.4,98.56 64.84,98.56 65,98.4 65,96.4 R76.2@64.95,96.35
NetR78_1: R78.1 R79.2 U26.2 | length 3
  Top Layer w0.2: U26.2@54.1,106 54.6,106 55.3,106.7 R78.1@55.4,106.7 R79.2@55.4,108.1
NetR81_2: R81.2 R82.2 R85.2 U29.1 | length 10.6
  Top Layer w0.2: R82.2@101.65,99.4 R81.2@103.075,99.4 103.075,98.725 103.4,98.4 105.4,98.4 105.65,98.65 R85.2@105.65,99.4 105.65,100.05 106.2,100.6 106.2,102.9 106,103.1 105.15,103.1 U29.1@105.1,103.15
NetR83_1: R83.1 RL2.2 | length 1.8
  Top Layer w0.2: R83.1@66.425,86.7 68.17,86.7 RL2.2@68.21,86.66
NetR87_1: R87.1 RL3.2 | length 12.5
  Top Layer w0.2: R87.1@93.8,24.875 93.925,25 104.5,25 105,24.5 RL3.2@105,23.5
NetR87_2: R87.2 U20.29 | length 7.6
  Top Layer w0.2: U20.29@86.55,26.45 87.15,26.45 87.4,26.7 93.225,26.7 R87.2@93.8,26.125
NetR92_2: R92.2
NetR93_2: R93.2 U19.25 | length 2.1
  Top Layer w0.12: R93.2@56.3,48.175 56.8,47.675 U19.25@56.8,46.25
NetR94_1: R94.1 U19.11 | length 6
  Top Layer w0.12: U19.11@61.9,43.75 62.45,43.75 62.7,43.5 65,43.5 65.2,43.7 65.2,45.05 R94.1@66,45.85
NetR94_2: R94.2 U19.10 | length 5
  Top Layer w0.12: U19.10@61.9,43.25 65.65,43.25 66,43.6 R94.2@66,44.4
NetR95_2: R95.2 U19.28 | length 7.4
  Top Layer w0.12: R95.2@54.508,48.178 53.5,47.17 53.5,44.9 54.1,44.3 55.9,44.3 56.35,44.75 U19.28@56.8,44.75
NetR96_1: R96.1 U19.16 | length 2.6
  Top Layer w0.12: U19.16@61.9,46.25 62.25,46.25 62.5,46.5 62.5,47 63.45,47.95 R96.1@63.5,47.95
NetR96_2: R96.2 U19.15 | length 1.9
  Top Layer w0.12: U19.15@61.9,45.75 62.25,45.75 62.6,46.1 63.1,46.1 R96.2@63.5,46.5
NetR98_1: R98.1 U1.50 | length 73.2
  Top Layer w0.12: R98.1@98.85,15.6 98.95,15.5 v1(100.5,15.5)
  Bottom Layer w0.12: U1.50@29.692,13.81 98.81,13.81 v1(100.5,15.5)
NetR100_1: R100.1 U1.49 | length 77.7
  Top Layer w0.12: R100.1@98.95,18 v1(100.2,18)
  Bottom Layer w0.12: U1.49@29.692,11.27 33.77,11.27 36,13.5 99.6,13.5 101.2,15.1 101.2,17 v1(100.2,18)
NetR108_2: R108.2 U20.25 | length 3.3
  Top Layer w0.12: U20.25@86.55,24.45 86.55,23.05 87.05,22.55 R108.2@88.2,22.55
NetR109_1: R109.1 U20.11 | length 7.5
  Top Layer w0.12: R109.1@77.1,23.85 77.825,23.85 78,24.025 78,26.9 78.3,27.2 80.7,27.2 80.95,26.95 U20.11@81.45,26.95
NetR109_2: R109.2 U20.10 | length 6
  Top Layer w0.12: R109.2@77.2,25.225 77.2,26.7 77.95,27.45 U20.10@81.45,27.45
NetR110_2: R110.2 U20.28 | length 38.4
  Top Layer w0.12: R110.2@69,12.575 69.775,12.575 70.2,13 v1(70.2,14.9) ; U20.28@86.55,25.95 87.35,25.95 87.7,26.3 90.8,26.3 91,26.1 91,21.5 v1(90,20.5)
  Bottom Layer w0.12: v1(70.2,14.9) 70.2,18.9 71.1,19.8 89.3,19.8 v1(90,20.5)
NetR111_1: R111.1 U20.16 | length 3
  Top Layer w0.12: R111.1@79.75,22.525 80.6,23.375 80.6,24.3 80.75,24.45 U20.16@81.45,24.45
NetR111_2: R111.2 U20.15 | length 2.1
  Top Layer w0.12: R111.2@79.75,23.975 80.725,24.95 U20.15@81.45,24.95
NetR112_1: R112.1 TP2.1 | length 2.3
  Top Layer w0.12: TP2.1@70.7,36.2 R112.1@70.7,38.45
NetR113_1: R113.1 TP3.1 | length 2.1
  Top Layer w0.12: TP3.1@93.3,47.5 R113.1@95.35,47.5
NetR118_2: R118.2 U21.25 | length 21.4
  Top Layer w0.12: U21.25@143.5,48.8 143.9,48.8 144.4,49.3 v1(144.4,49.7) ; v1(144,32) 144,30.55 R118.2@144.1,30.45
  Bottom Layer w0.12: v1(144,32) 143.5,32.5 143.5,48.8 v1(144.4,49.7)
NetR119_1: R119.1 U21.11 | length 5.2
  Top Layer w0.12: U21.11@141,43.7 141,43.1 140.7,42.8 140.7,40.8 140.9,40.6 141.7,40.6 142.35,39.95 R119.1@142.35,39.8
NetR119_2: R119.2 U21.10 | length 4.1
  Top Layer w0.12: U21.10@140.5,43.7 140.5,43 140.416,42.916 140.416,40.284 R119.2@140.9,39.8
NetR120_2: R120.2 U21.28 | length 25.2
  Top Layer w0.12: U21.28@142,48.8 142,49.2 142.6,49.8 v1(142.6,50.2) ; R120.2@146,30.45 v1(146,32)
  Bottom Layer w0.12: v1(142.6,50.2) 142.6,50.3 144.6,50.3 145,49.9 145,49.3 143.8,48.1 143.8,34.2 v1(146,32)
NetR121_1: R121.1 U21.29 | length 6.7
  Top Layer w0.12: U21.29@141.5,48.8 141.5,49.09 142.1,49.69 142.1,50 v1(141.8,50.3) ; R121.1@143.925,52.1 v1(144.9,52.1)
  Bottom Layer w0.12: v1(141.8,50.3) 142.6,51.1 143.9,51.1 v1(144.9,52.1)
NetR121_2: R121.2 U21.30 | length 4.7
  Top Layer w0.12: U21.30@141,48.8 141,49.3 141.361,49.661 v1(141.361,49.689) ; v1(141.6,52.2) 142.375,52.2 R121.2@142.475,52.1
  Bottom Layer w0.12: v1(141.361,49.689) 141.2,49.851 141.2,51.8 v1(141.6,52.2)
NetR122_1: R122.1 U21.16 | length 3.1
  Top Layer w0.12: U21.16@143.5,43.7 144.5,42.7 144.9,42.7 145.725,41.875 R122.1@145.725,41.75
NetR122_2: R122.2 U21.15 | length 2.5
  Top Layer w0.12: U21.15@143,43.7 143,43.2 144.275,41.925 R122.2@144.275,41.75
NetR124_1: R124.1 R126.2 U28.1 U28.2 | length 5.6
  Top Layer w0.14: R124.1@41.15,95 41.337,95 R124.1@41.425,95 41.525,95 41.8,95 42.6,95.8 R126.2@42.825,95.8 43.1,96.075 43.1,96.5 ; U28.1@43.05,97.775 43.05,96.55 43.1,96.5 ; U28.2@43.55,97.775 43.55,96.95 43.1,96.5
NetR127_2: R127.2 R130.2 U28.17 | length 8.2
  Top Layer w0.14: U28.17@43.55,101.825 43.55,104.45 44.32,105.22 46.72,105.22 R130.2@47.1,105.6 47.3,105.4 R127.2@47.3,104.15
NetR131_1: R131.1 U28.10 | length 1.9
  Top Layer w0.14: U28.10@46.325,100.05 48.15,100.05 R131.1@48.2,100.1
NetR135_1: R135.1 U25.12 | length 3.2
  Top Layer w0.2: U25.12@131.8,14.92 131.82,14.9 R135.1@134.95,14.9
NetR136_1: R136.1 U25.15 | length 3
  Top Layer w0.2: U25.15@131.8,18.73 131.83,18.7 R136.1@134.75,18.7
NetR138_2: R138.2 U23.25 | length 3.4
  Top Layer w0.14: R138.2@37.5,33 38.6,33 39.2,32.4 U23.25@39.2,30.95
NetR139_1: R139.1 U23.11 | length 7.2
  Top Layer w0.12: U23.11@44.3,28.45 44.65,28.45 45.072,28.872 47.772,28.872 48,29.1 48,31.7 48.25,31.95 R139.1@48.5,31.95
NetR139_2: R139.2 U23.10 | length 6.2
  Top Layer w0.12: U23.10@44.3,27.95 44.75,27.95 45,28.2 45,28.378 45.222,28.6 48.1,28.6 48.5,29 R139.2@48.5,30.5
NetR140_1: R140.1 U23.16 | length 3.4
  Top Layer w0.12: U23.16@44.3,30.95 44.85,30.95 45.1,31.2 45.1,32.1 R140.1@46.25,33.25
NetR140_2: R140.2 U23.15 | length 2.5
  Top Layer w0.12: U23.15@44.3,30.45 44.55,30.45 44.8,30.7 45.1,30.7 46.2,31.8 R140.2@46.25,31.8
NetR142_1: R142.1 U23.24 | length 14.3
  Top Layer w0.12: v1(38.9,37) 38.4,37 37.9,36.5 37.9,34.4 40,32.3 U23.24@40,31.75 ; v1(43,37) 43,39.1 43.085,39.185 43.085,39.81 R142.1@43.475,40.2
  Int2 (PWR) w0.12: v1(38.9,37) v1(43,37)
NetR142_2: R142.2 U23.17 | length 9.8
  Top Layer w0.12: U23.17@43.5,31.75 43.75,31.75 44.6,32.6 45.03,32.6 45.4,32.97 45.4,39.65 44.925,40.125 R142.2@44.925,40.2
NetR144_2: R144.2 U18.6 U19.30 | length 32
  Top Layer w0.12: v1(54.3,42.6) 54.8,42.6 55.95,43.75 U19.30@56.8,43.75 ; R144.2@58.275,59.8 58.275,59.725 57,58.45 57,55.6 57.4,55.2 v1(58.2,55.2) 58.2,56.2 58.45,56.45 U18.6@59.225,56.45
  Bottom Layer w0.12: v1(54.3,42.6) 55.3,42.6 55.6,42.9 56.8,42.9 57,42.7 60.8,42.7 61.4,43.3 61.4,51.6 58.2,54.8 v1(58.2,55.2)
NetR145_1: R145.1 U23.14 | length 16.2
  Top Layer w0.12: U23.14@44.3,29.95 44.5,29.95 44.85,30.3 45.4,30.3 46,30.9 47,30.9 47.3,31.2 47.3,33.7 45.9,35.1 45.9,41.95 45.025,42.825 R145.1@45.025,42.9
NetR146_2: R146.2 U1.22 U16.4 | length 53.3
  Top Layer w0.14: U1.22@32.74,58.26 37.96,58.26 39.3,59.6 39.3,69.9 41.7,72.3 41.7,75.3 44.6,78.2 44.6,81.25 v1(44.35,81.5) ; v1(46,81.5) 46.2,81.7 54.8,81.7 57.9,84.8 57.9,90.25 U16.4@56.75,91.4
  Bottom Layer w0.14: v1(44.35,81.5) v1(46,81.5)
NetR148_2: R148.2 R151.1 | length 3
  Top Layer w0.2: R148.2@143.675,101.6 143.9,101.375 143.9,100.8 144.3,100.4 144.6,100.4 144.775,100.225 144.775,99.75 R151.1@145.125,99.4
NetR153_1: R153.1 R171.2 | length 2
  Top Layer w0.2: R171.2@129.825,88.5 R153.1@131.875,88.5
NetR163_1: R163.1 R164.2 | length 3
  Top Layer w0.2: R164.2@149.975,14.5 149.975,13.65 151.45,12.175 R163.1@151.45,12.1
NetU1_7: U1.7 U14.4 | length 29.9
  Top Layer w0.12: U14.4@59,19.5 v1(60.5,19.5)
  Bottom Layer w0.12: U1.7@32.74,20.16 33.8,19.1 60.1,19.1 v1(60.5,19.5)
NetU1_8: U1.8 U15.4 | length 26.1
  Top Layer w0.12: U15.4@54.85,19.5 55.15,19.8 v1(56,19.8)
  Bottom Layer w0.12: U1.8@32.74,22.7 36.04,19.4 55.6,19.4 v1(56,19.8)
NetU1_9: U1.9 U11.7 U19.7 U20.7 U21.7 U23.7 U27.7 | length 202.3
  Top Layer w0.12: U23.7@43,26.65 43,25.3 43.274,25.026 43.274,23.976 v1(43.4,23.85) ; U19.7@60.6,41.95 60.6,41.1 60.2,40.7 60.2,29.6 60.5,29.3 60.5,28 v1(61,27.5) ; v1(82.2,31.2) 82.2,29.8 82.75,29.25 U20.7@82.75,28.75 ; v1(89.8,58.7) 90.2,59.1 90.2,61.8 90.45,62.05 U11.7@90.45,62.95 ; U27.7@134.35,68.25 134.35,67.859 134.709,67.5 136.7,67.5 137.2,67 137.2,52.8 v1(137.5,52.5) ; v1(136.2,45) U21.7@139.2,45
  Bottom Layer w0.12: U1.9@32.74,25.24 37.96,25.24 41,22.2 42.2,22.2 42.7,22.7 42.7,23.15 v1(43.4,23.85) 43.75,23.5 45.2,23.5 46.1,24.4 57.1,24.4 58.3,25.6 59.6,25.6 60.1,26.1 60.1,26.6 v1(61,27.5) 61.7,28.2 62.3,28.2 65.6,31.5 81.9,31.5 v1(82.2,31.2) 82.2,30 83.7,28.5 86.1,28.5 87,29.4 87,56.1 87.7,56.8 88.4,56.8 89.8,58.2 v1(89.8,58.7) 90.3,59.2 119.5,59.2 133.7,45 v1(136.2,45) ; v1@136.203,45.003 138.103,45.003 138.4,45.3 138.4,47.3 137.3,48.4 137.3,51.4 137.5,51.6 v1(137.5,52.5)
NetU1_19: U1.19 U27.4 | length 126.4
  Top Layer w0.12: U1.19@32.74,50.64 36.96,50.64 37.9,49.7 v1(39,49.7) ; U27.4@132.85,68.25 132.835,68.235 132.835,67.835 132.8,67.8 132.8,67.3 133,67.1 134,67.1 134.5,66.6 134.5,62.2 v1(133.8,61.5)
  Bottom Layer w0.12: v1(39,49.7) 39,57.4 43.09,61.49 67.81,61.49 73.2,56.1 84,56.1 84.2,55.9 84.8,55.9 85.1,56.2 85.1,60.59 86.01,61.5 v1(133.8,61.5)
NetU1_20: U1.20
NetU1_21: U1.21
REF2V5: C125.2 J17.2 U11.31 U19.31 U20.31 U21.31 U24.5 U24.6 U27.31 | length 182.9
  Top Layer w0.12: v1(56,36.5) 55.3,36.5 54.8,37 54.8,42 56.05,43.25 U19.31@56.8,43.25 ; v1(61.5,34) 63.6,31.9 82.7,31.9 84.1,33.3 84.1,35.5 86.4,37.8 ; U20.31@86.55,27.45 96.98,27.45 J17.2@97.13,27.6 ; U11.31@86.65,64.25 86.25,64.25 84.1,62.1 84.1,57.3 83.6,56.8 83.6,55.8 86.4,53 86.4,37.8 ; C125.2@97.45,30.6 97.45,27.92 J17.2@97.13,27.6 ; v1(129.9,69.7) 129.95,69.7 130.1,69.55 U27.31@130.55,69.55 ; v1(139.5,49.5) 140.1,49.5 140.5,49.1 U21.31@140.5,48.8 ; 86.4,37.8 96.6,27.6 J17.2@97.13,27.6
  Top Layer w0.3: U24.5@97.4,33.5 U24.6@97.4,32.55 97.4,30.65 C125.2@97.45,30.6
  Int2 (PWR) w0.12: v1(129,47.5) 131,49.5 ; v1(129.9,69.7) 130.5,69.7 132.3,67.9 132.3,67.1 132,66.8 132,62 131,61 131,60.5 131,49.5 ; v1(139.5,49.5) 131,49.5
  Bottom Layer w0.12: v1(56,36.5) 59,36.5 v1(61.5,34) ; J17.2@97.13,27.6 97.13,30.13 105,38 119.5,38 v1(129,47.5)